# Altium PCB ESP32-C3FH4.PcbDoc (part 2 of 2)
Units mil, origin at the board's own origin, x right, y up, seen from the top; angles counter-clockwise.
Board outline 1414.34 x 2244.79 mil, 4 copper layers (Top Layer, GND, POWER, Bottom Layer), stack 30.634 mil thick; 67 components, 59 nets, 293 pads, 163 vias.
Unrouted connection lines stored in the file: 2.
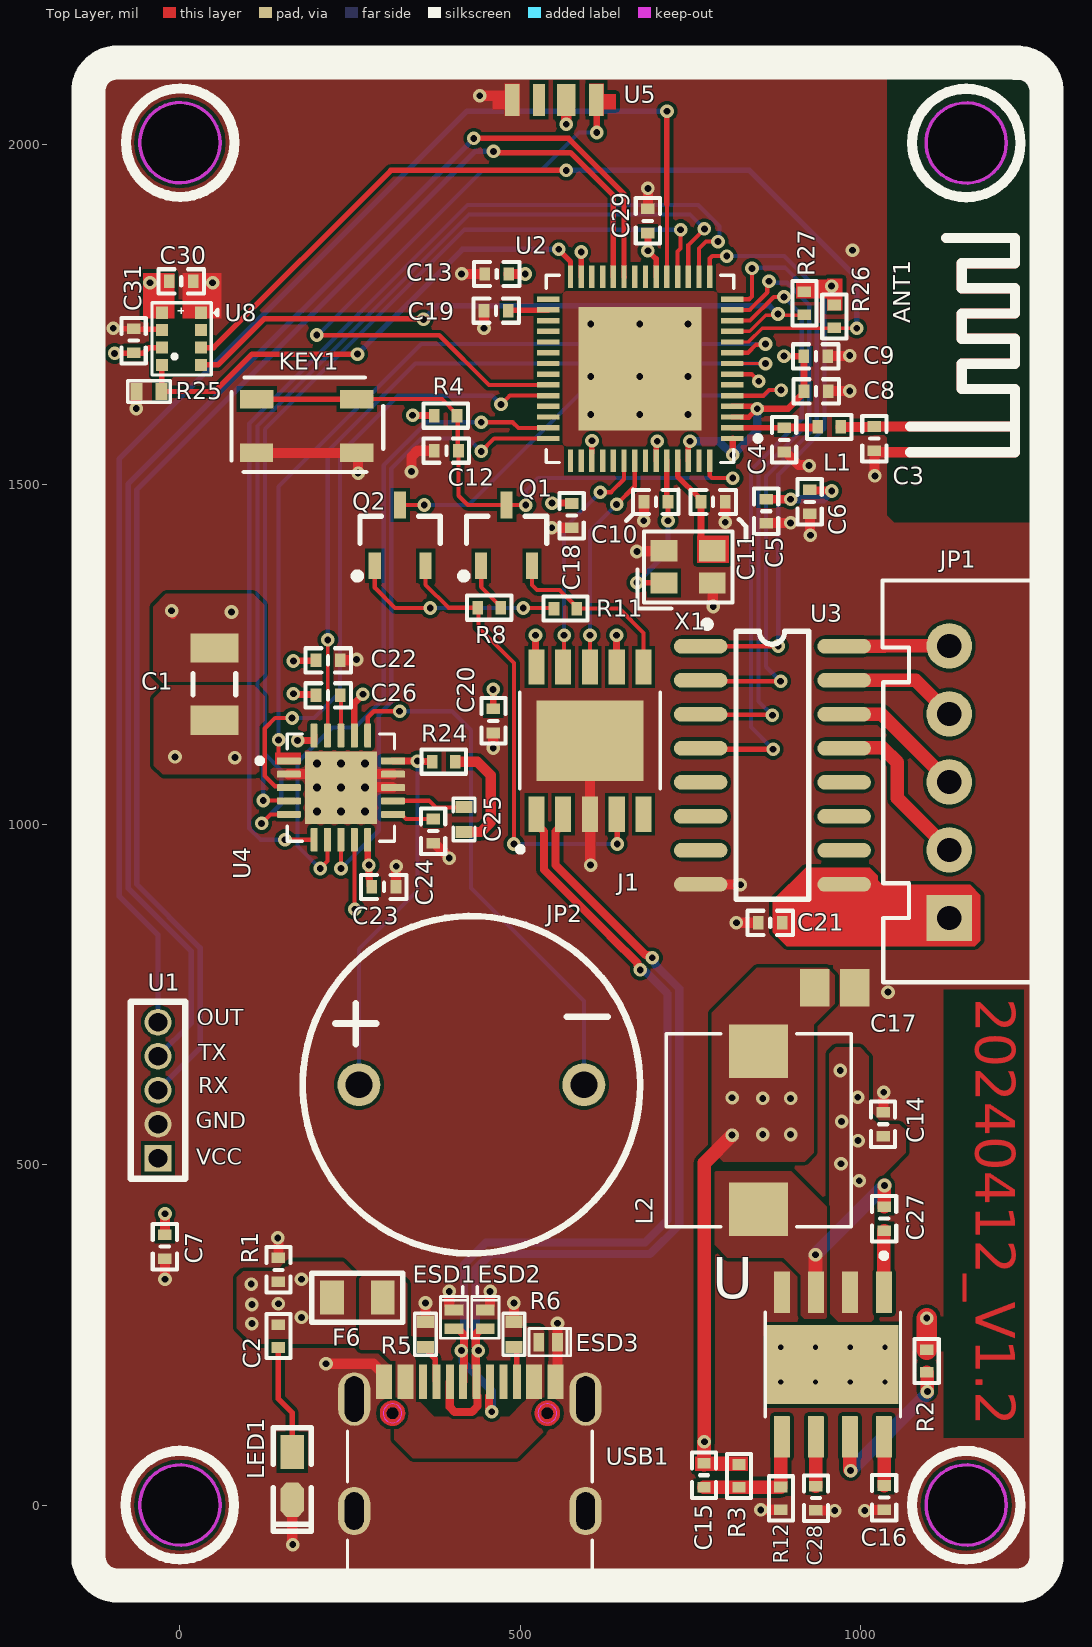
[diagram p0: Top Layer view]

## Keep-outs (continued)
Keep-Out Layer: (continued)
  circle w5: c1155.83,2002.37 r59.06
  lines w5: -134.51,2075.18 cw(c-92.21,2078.18) -95.21,2120.48 ccw(c-92.21,2078.18) -134.51,2075.18 ; -134.21,-78.82 ccw(c-91.91,-75.82) -88.91,-118.12 cw(c-91.91,-75.82) -134.21,-78.82 ; 1228.64,2120.28 cw(c1231.64,2077.98) 1273.94,2080.98 ccw(c1231.64,2077.98) 1228.64,2120.28 ; 1234.44,-118.12 ccw(c1231.44,-75.82) 1273.74,-72.82 cw(c1231.44,-75.82) 1234.44,-118.12
  lines w6.16: -134.21,-82.02 -134.21,2073.88 -134.21,-82.02 ; -95.21,2120.48 1231.89,2120.48 -95.21,2120.48 ; -88.91,-118.12 1236.19,-118.12 -88.91,-118.12 ; 1273.94,-72.82 1273.94,2079.28 1273.94,-72.82

## Other copper
Top Layer:
  rectangle net NetC11_1: 760,1385 806.93,1425
  rectangle net 3.3V: 951,1756 974,1803
  rectangle net 3.3V: 906,1774 974,1802
  region net GND: 61,1811 4,1811 4,1744 61,1744
  rectangle net 3.3V: -54,1744 -8,1811
  rectangle net GND: 546.37,166 558.18,206.95
  rectangle net 3.3V: 757,50 835,71
  rectangle net OUT3: 140,1089 178,1106
  rectangle net GND: 292.11,159.23 307.21,201.89
  pour cut-out: -45,1772 49,1772 49,1658 -45,1658 -45,1773
  pour cut-out: 1046.83,2120.82 1038.79,2112.78 1038.79,1454.78 1049.79,1443.78 1263.79,1443.78 1273.94,1453.93 1273.94,2099.33 1252.18,2121.1 1244.92,2121.1
  region net VIN5V: 1032.79,911.78 1025.79,918.78 1025.79,924.78 1013.79,936.78 919.79,936.78 871.79,888.78 871.79,842.3 892.31,821.78 1168.79,821.78 1176.79,829.78 1176.79,896.78 1161.79,911.78
  pour cut-out: 1240.79,757.78 1240.79,98.78 1122.79,98.78 1122.79,757.78
  text "20240412_V1.2" at 1150.79,744.78 h100 r270
Bottom Layer:
  pour cut-out: 1046.83,2120.82 1038.79,2112.78 1038.79,1454.78 1049.79,1443.78 1263.79,1443.78 1273.94,1453.93 1273.94,2099.33 1252.18,2121.1 1244.92,2121.1
GND (plane layer: these items are gaps in the copper):
  pour cut-out: 1046.83,2120.82 1038.79,2112.78 1038.79,1454.78 1049.79,1443.78 1263.79,1443.78 1273.94,1453.93 1273.94,2099.33 1252.18,2121.1 1244.92,2121.1
  lines w50: 1273.94,-72.82 1273.94,2079.28 1273.94,-72.82
POWER (plane layer: these items are gaps in the copper):
  pour cut-out: 1046.83,2120.82 1038.79,2112.78 1038.79,1454.78 1049.79,1443.78 1263.79,1443.78 1273.94,1453.93 1273.94,2099.33 1252.18,2121.1 1244.92,2121.1
  lines w30: -143.21,1489.78 -143.21,1270.78 ; 180,837 714,837 784,907 814,937 814,1204 888,1278 888,1491 888,1683 807,1683 807,1491 807,1303 799,1295 741,1237 741,968 688,915 181,915 ; 236.7,1090.13 315.77,1090.13 ; 319.59,1093.94 315.77,1090.13 ; 1263.79,916.78 933.79,916.78 933.79,373 312,373 181.58,373 179.79,374.79 179.79,1041.78 236.49,1098.48 236.49,1270.78 -143.21,1270.78 ; -143.21,1270.78 -133.21,1270.78 -133.21,1440.78 242.79,1440.78 348.79,1334.78 348.79,1123.14 315.77,1090.13

## Silkscreen, mask and mechanical layers (free items; w line width, h text height)
Top Overlay:
  circle w15: c-0.21,-0.01 r79.68
  circle w15: c0.39,2002.79 r79.68
  circle w15: c1156.09,2002.28 r79.68
  circle w15: c1156.09,-0.12 r79.68
  lines w5: 416,310.73 416,321.27 ; 437,310.47 437,321
  lines w7: 656.26,1447 666.33,1457.07 ; 822,1449 832,1439 832,1418
  lines w50: -134.51,2075.18 cw(c-92.21,2078.18) -95.21,2120.48 1231.89,2120.48 ; -134.21,-83.02 -134.21,2072.88 ; -134.21,-78.84 ccw(c-91.91,-75.84) -88.91,-118.14 1236.19,-118.12 ; 1228.64,2120.28 cw(c1231.64,2077.98) 1273.94,2080.98 ; 1234.44,-118.12 ccw(c1231.44,-75.82) 1273.74,-72.82 ; 1273.84,-72.82 1273.84,2079.28
  text "OUT" at 25,697 h40
  text "TX" at 27,646 h40
  text "RX" at 27,597 h40
  text "GND" at 23,546 h40
  text "VCC" at 24,492 h40
Bottom Overlay:
  circle w15: c1155.99,-0.12 r79.68
  circle w15: c1155.99,2002.28 r79.68
  circle w15: c0.29,2002.79 r79.68
  circle w15: c-0.21,-0.01 r79.68
  lines w50: 1273.94,-72.82 1273.94,2079.28 ; -95.21,2120.48 ccw(c-92.21,2078.18) -134.51,2075.18 cw(c-92.21,2078.18) -95.21,2120.48 ; -95.21,2120.48 1231.89,2120.48 -95.21,2120.48 ; -88.91,-118.14 cw(c-91.91,-75.84) -134.21,-78.84 ccw(c-91.91,-75.84) -88.91,-118.14 ; -88.91,-118.12 1236.19,-118.12 -88.91,-118.12 ; -134.21,-82.02 -134.21,2073.88 -134.21,-82.02 ; 1228.64,2120.28 cw(c1231.64,2077.98) 1273.94,2080.98 ccw(c1231.64,2077.98) 1228.64,2120.28 ; 1234.44,-118.12 ccw(c1231.44,-75.82) 1273.74,-72.82 cw(c1231.44,-75.82) 1234.44,-118.12
  text "1C" at 1209.59,1202.78 h45
  text "2C" at 1211.88,1097.78 h45
  text "3C" at 1211.59,997.78 h45
  text "4C" at 1212.66,901.78 h45
  text "+5V" at 1232.79,794.78 h45
Board_outline:
  lines w10: -134.51,2075.18 cw(c-92.21,2078.18) -95.21,2120.48 1231.89,2120.48 ; -134.21,-83.02 -134.21,2072.88 ; -134.21,-78.84 ccw(c-91.91,-75.84) -88.91,-118.14 1236.19,-118.12 ; 1228.64,2120.28 cw(c1231.64,2077.98) 1273.94,2080.98 ; 1234.44,-118.12 ccw(c1231.44,-75.82) 1273.74,-72.82 ; 1273.84,-72.82 1273.84,2079.28

## Dimensions
1231.64,2120.39 to 1236.19,-118.12 on Top Overlay
1273.94,2080.98 to -134.21,2072.88 on Top Overlay